# Allegro board B-G431B-ESC1_V10_220728.brd
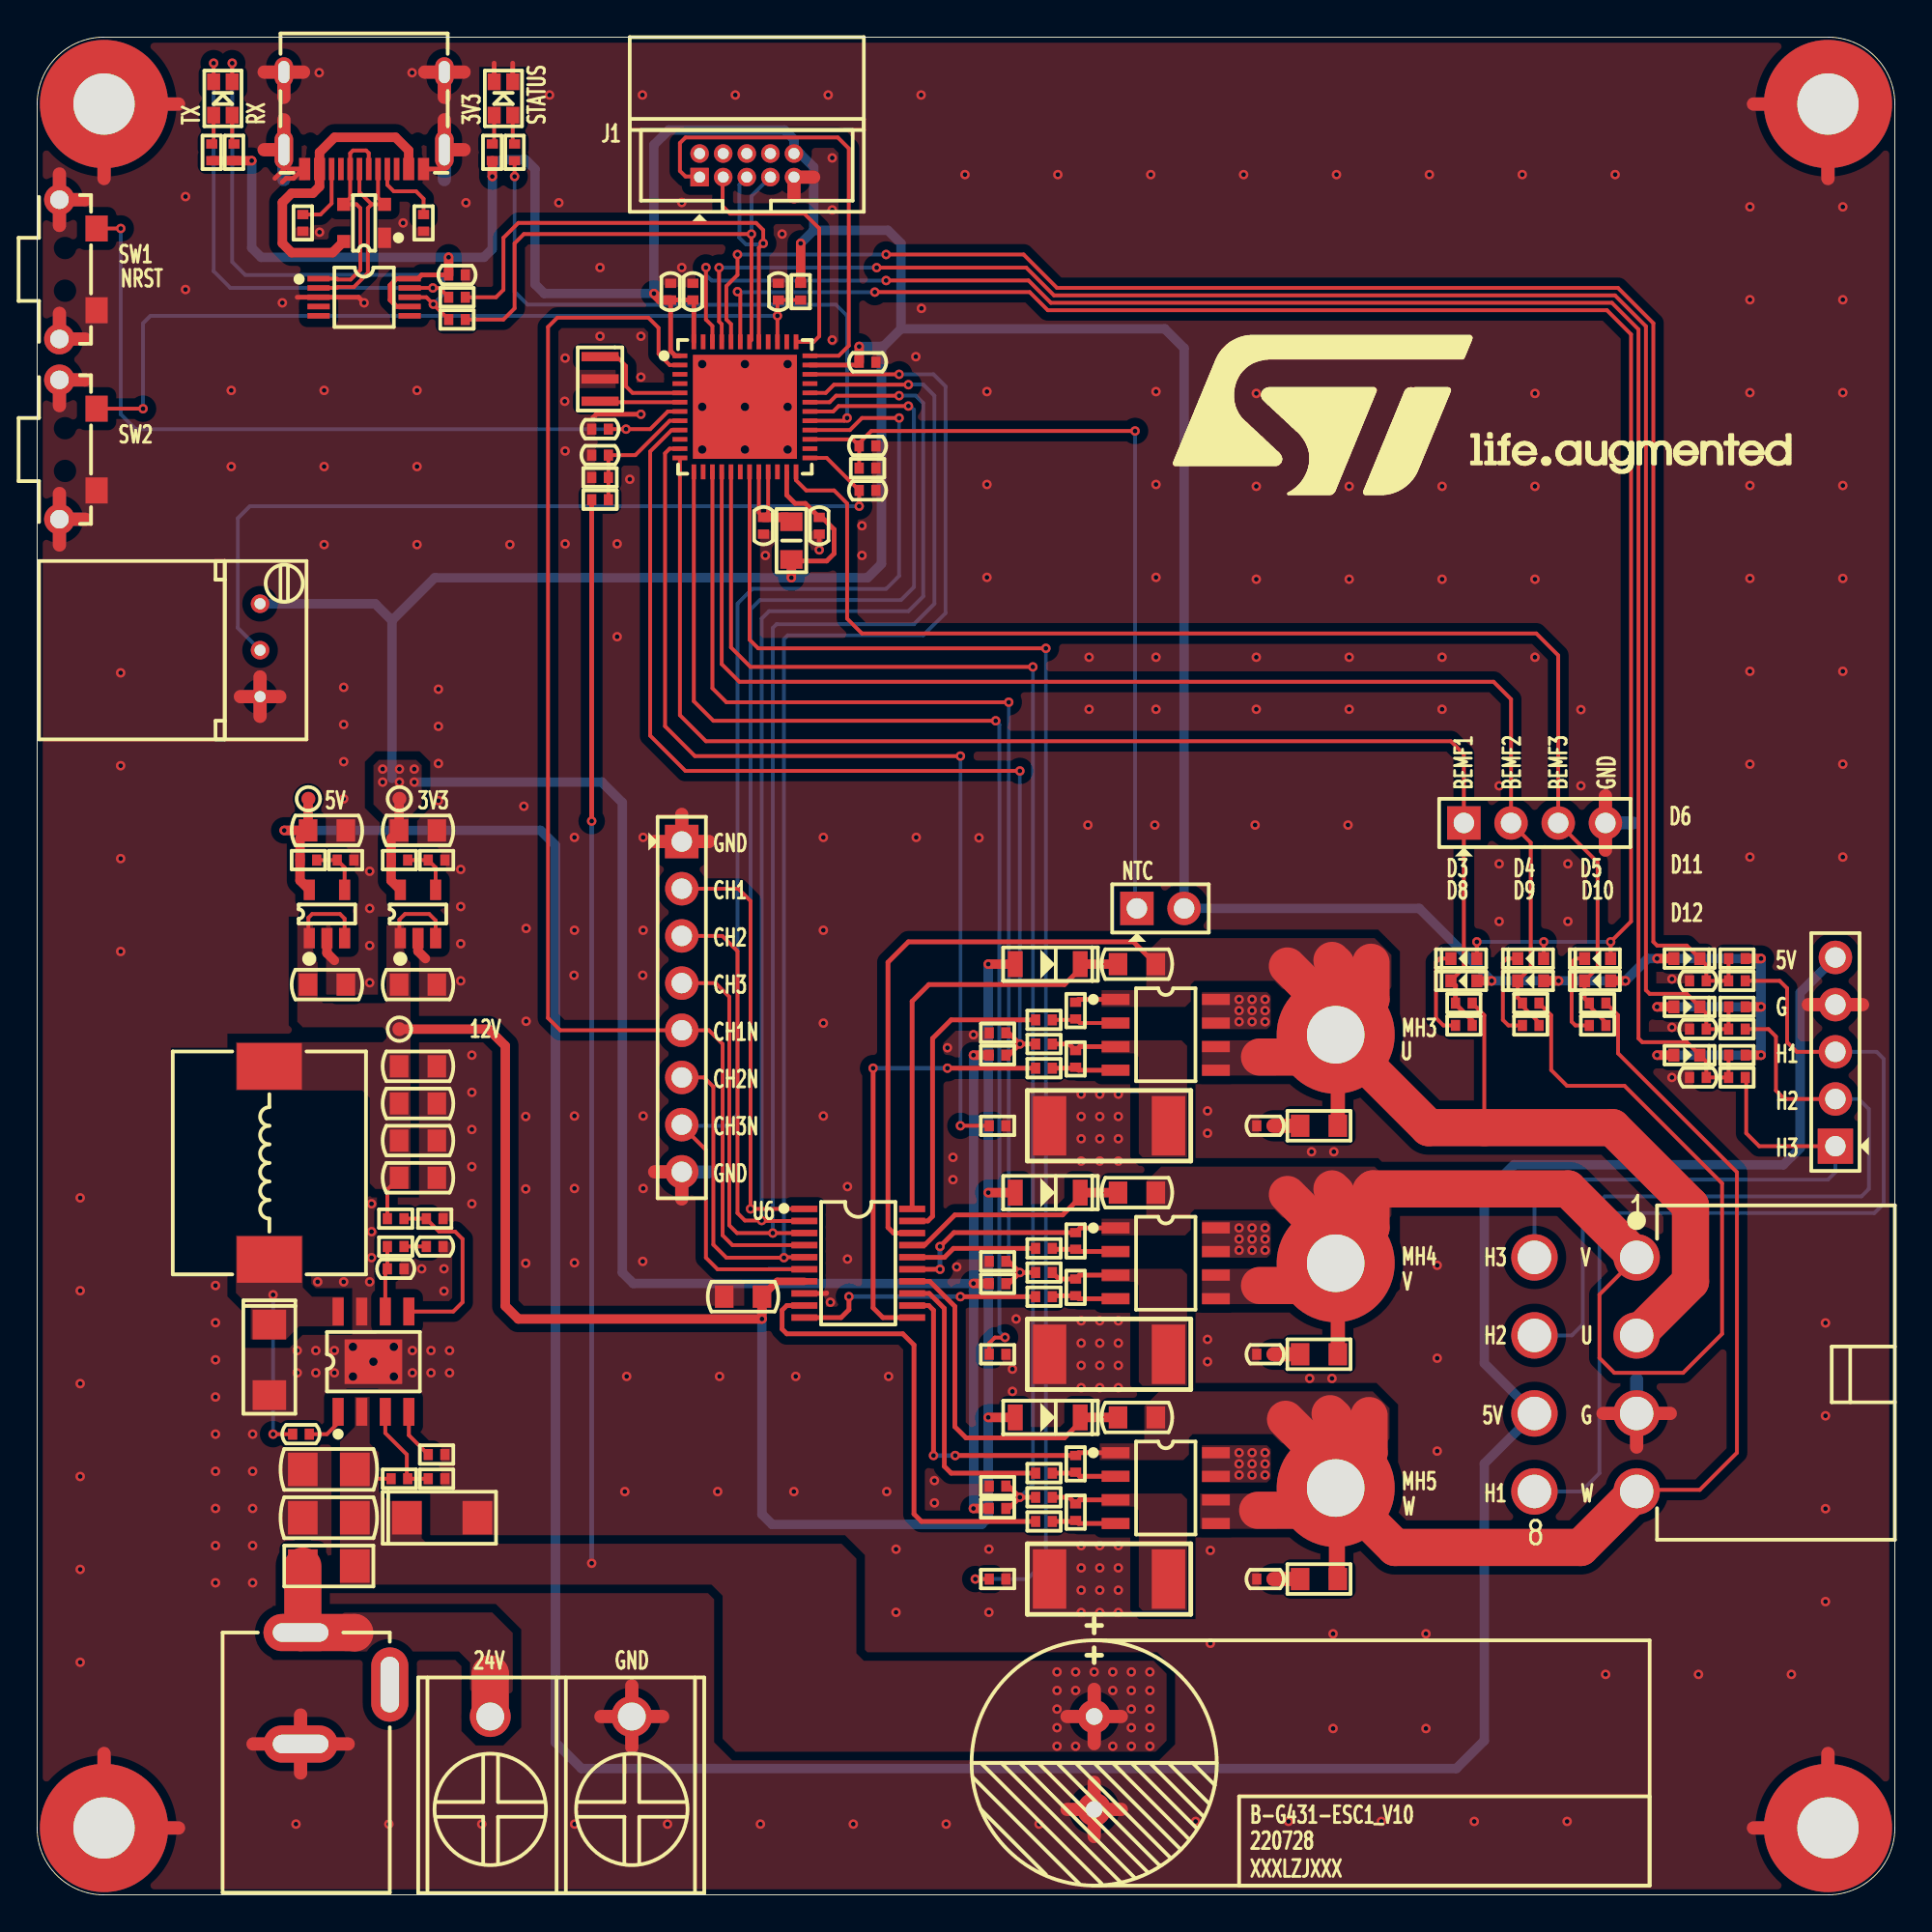
[diagram p0: board, top side]
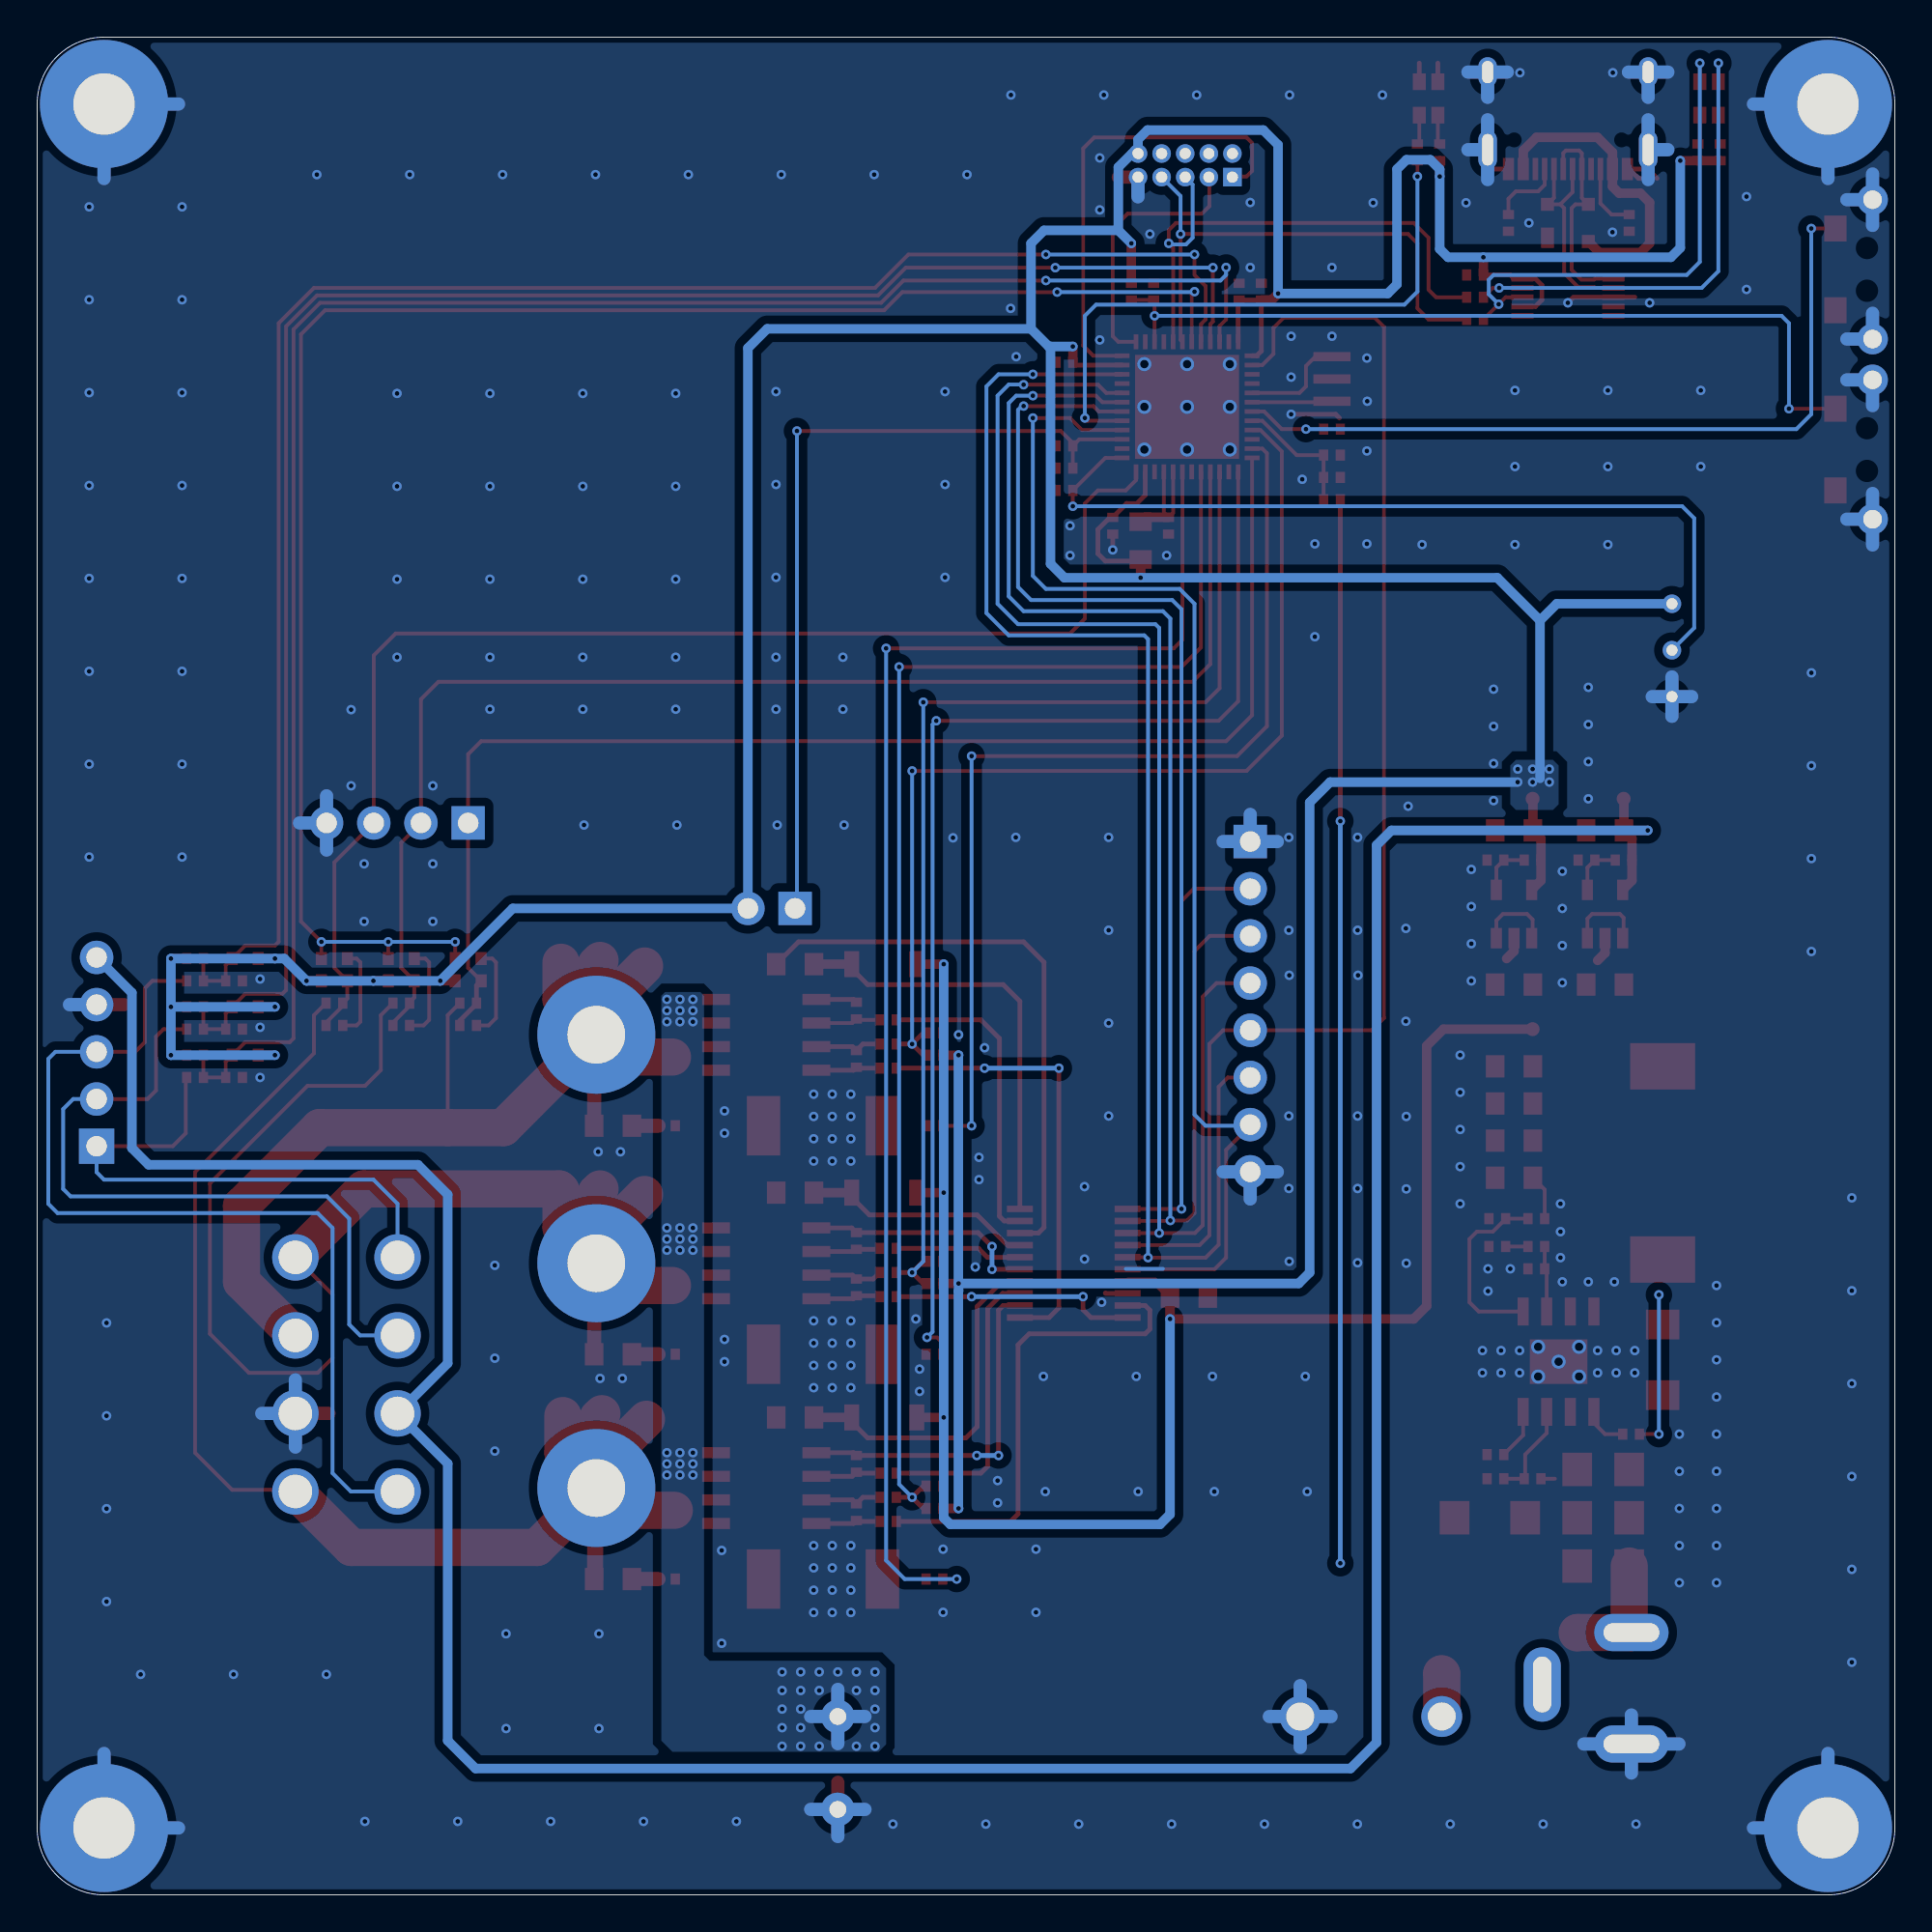
[diagram p1: board, bottom side, seen from below]

Outline 100 x 100 mm; copper layers: TOP, BOTTOM. Coordinates in mm from the lower left corner of the outline.
Outline path: 0,96.4 arc(1.05,98.95) 3.6,100 96.4,100 arc(98.95,98.95) 100,96.4 100,3.6 arc(98.95,1.05) 96.4,0 3.6,0 arc(1.05,1.05) 0,3.6 0,96.4

## Design rules (mm)
constraint set DEFAULT: min track width 0.203, pair gap 0.203
net group USB_D: nets USB_DM USB_DP

## Placement (name value [footprint] x y rotation side)
C1  100nF_50V  [C0402]  22.6 87.2 180 top
C2  100nF_50V  [C0402]  34.1 86.3 90 top
C3  100nF_50V  [C0402]  35.3 86.3 90 top
C4  100nF_50V  [C0402]  39.9 86.3 90 top
C5  100nF_50V  [C0402]  44.7 82.5 0 top
C6  100nF_50V  [C0402]  30.3 78.9 180 top
C7  100nF_50V  [C0402]  44.7 78 0 top
C8  100nF_50V  [C0402]  30.3 77.5 180 top
C9  100nF_50V  [C0402]  44.7 75.6 0 top
C10  100nF_50V  [C0402]  39.1 73.7 270 top
C11  100nF_50V  [C0402]  42.1 73.7 270 top
C12  10uF_25V  [C0805]  15.6 57.3 0 top
C13  10uF_25V  [C0805]  20.5 57.3 0 top
C14  1uF_50V  [C0805]  59.2 50.1 0 top
C15  100nF_50V  [C0402]  89.4 49.2 180 top
C16  10uF_25V  [C0805]  15.6 49 0 top
C17  10uF_25V  [C0805]  20.5 49 0 top
C18  100nF_50V  [C0402]  89.4 46.6 180 top
C19  10uF_25V  [C0805]  20.5 44.6 0 top
C20  100nF_50V  [C0402]  89.4 44 180 top
C21  10uF_25V  [C0805]  20.5 42.6 0 top
C22  10nF_50V  [C0402]  66.1 41.4 180 top
C23  10uF_25V  [C0805]  20.5 40.6 0 top
C24  10uF_25V  [C0805]  20.5 38.6 0 top
C25  1uF_50V  [C0805]  59.2 37.8 0 top
C26  10nF_50V  [C0402]  21.4 34.9 0 top
C27  47pF_50V  [C0402]  19.3 33.7 0 top
C28  10uF_25V  [C0805]  38 32.2 180 top
C29  10nF_50V  [C0402]  66.1 29.1 180 top
C30  1uF_50V  [C0805]  59.2 25.7 0 top
C31  100nF_50V  [C0402]  14.2 24.8 180 top
C32  10uF_50V  [C1206]  15.7 22.9 180 top
C33  10uF_50V  [C1206]  15.7 20.3 180 top
C34  10nF_50V  [C0402]  66.1 17 180 top
C35  1000uF_50V  [CAP-5R0-13X27]  56.9 7.1 270 top
D1  -  [XL-2012SURUGC]  10 96.7 270 top
D2  -  [XL-2012SURUGC]  25.1 96.7 270 top
D3  LRB521S-40T1G  [SOD523]  76.8 50.4 0 top
D4  LRB521S-40T1G  [SOD523]  80.4 50.4 0 top
D5  LRB521S-40T1G  [SOD523]  84 50.4 0 top
D6  LRB521S-40T1G  [SOD523]  88.8 50.4 180 top
D7  1N4148  [SOD123]  54.4 50.1 180 top
D8  LRB521S-40T1G  [SOD523]  76.8 49.2 0 top
D9  LRB521S-40T1G  [SOD523]  80.4 49.2 0 top
D10  LRB521S-40T1G  [SOD523]  84 49.2 0 top
D11  LRB521S-40T1G  [SOD523]  88.8 47.8 180 top
D12  LRB521S-40T1G  [SOD523]  88.8 45.2 180 top
D13  1N4148  [SOD123]  54.4 37.8 180 top
D14  SS56F  [SMAF]  12.5 28.8 90 top
D15  1N4148  [SOD123]  54.4 25.7 180 top
D16  SS56F  [SMAF]  21.8 20.3 180 top
DC1  -  [DC005]  14.18 8.12 90 top
F1  0469005.WR  [FUSE1206]  15.7 17.7 0 top
J1  -  [DC3-10P-Z]  38.2 93.1 180 top
J2  -  [CN1X5-2P54-Z]  96.8 40.3 90 top
J3  -  [HX42003-8WAF]  86.1 28.01 0 top
J4  KF7.62-2P  [KF7R62-2P]  28.2 9.6 180 top
J5  -  [CN1X8-2P54-Z]  34.7 56.7 270 top
J6  -  [CN1X4-2P54-Z]  76.8 57.7 0 top
L1  BLM21PG600SN1D  [L0805]  40.6 72.9 90 top
L2  SMMS1040-6R8  [L10040]  12.5 39.4 90 top
MH1  HOLE_M3/NI  [HOLE6R90X3R40]  3.6 96.4 0 top
MH2  HOLE_M3/NI  [HOLE6R90X3R40]  96.4 96.4 0 top
MH3  HOLE_M3/NI  [HOLE6R35X3R10]  69.9 46.3 0 top
MH4  HOLE_M3/NI  [HOLE6R35X3R10]  69.9 34 0 top
MH5  HOLE_M3/NI  [HOLE6R35X3R10]  69.9 21.9 0 top
MH6  HOLE_M3/NI  [HOLE6R90X3R40]  3.6 3.6 0 top
MH7  HOLE_M3/NI  [HOLE6R90X3R40]  96.4 3.6 0 top
NOREF  -  []  0 0 0 top
NOREF#2  -  []  0 0 90 top
Q1  NCE6005AS  [SOIC8]  60.75 46.3 270 top
Q2  NCE6005AS  [SOIC8]  60.75 34 270 top
Q3  NCE6005AS  [SOIC8]  60.75 21.9 270 top
R1  4.7K  [R0402]  9.4 93.8 270 top
R2  4.7K  [R0402]  10.6 93.8 270 top
R3  1K  [R0402]  24.5 93.8 90 top
R4  1K  [R0402]  25.7 93.8 90 top
R5  4.7K  [R0402]  14.3 90 270 top
R6  4.7K  [R0402]  20.8 90 90 top
R7  10K  [R0402]  41.1 86.3 270 top
R8  1K  [R0402]  22.6 86 180 top
R9  1K  [R0402]  22.6 84.8 180 top
R10  47K  [R0402]  44.7 76.8 180 top
R11  22K  [R0402]  30.3 76.3 0 top
R12  200K  [R0402]  30.3 75.1 180 top
R13  63.4K  [R0402]  14.6 55.7 0 top
R14  20K  [R0402]  16.6 55.7 0 top
R15  33K  [R0402]  19.5 55.7 0 top
R16  20K  [R0402]  21.5 55.7 0 top
R17  MF52A103F3950(A1)  [CN1X2-2P54-Z]  59.2 53.1 0 top
R18  10K  [R0402]  91.5 50.4 0 top
R19  1.5K  [R0402]  91.5 49.2 180 top
R20  10K  [R0402]  76.8 48 180 top
R21  10K  [R0402]  80.4 48 180 top
R22  10K  [R0402]  84 48 180 top
R23  10K  [R0402]  91.5 47.8 0 top
R24  10K  [R0402]  55.9 47.6 90 top
R25  33R  [R0402]  54.2 47.1 0 top
R26  2.2K  [R0402]  76.8 46.8 180 top
R27  2.2K  [R0402]  80.4 46.8 180 top
R28  2.2K  [R0402]  84 46.8 180 top
R29  1.5K  [R0402]  91.5 46.6 180 top
R30  2.2K  [R0402]  51.7 46.4 0 top
R31  1.5K  [R0402]  54.2 45.8 0 top
R32  22K  [R0402]  51.7 45.2 180 top
R33  10K  [R0402]  91.5 45.2 0 top
R34  10K  [R0402]  55.9 45 270 top
R35  33R  [R0402]  54.2 44.5 0 top
R36  1.5K  [R0402]  91.5 44 180 top
R37  0R/NI  [R0402]  51.7 41.4 0 top
R38  0R003  [R2512]  57.7 41.4 0 top
R39  1R  [R0805]  69 41.4 0 top
R40  200K  [R0402]  19.3 36.4 0 top
R41  14.3K  [R0402]  21.4 36.4 0 top
R42  10K  [R0402]  55.9 35.2 90 top
R43  10K  [R0402]  19.3 34.9 180 top
R44  33R  [R0402]  54.2 34.8 0 top
R45  2.2K  [R0402]  51.7 34.1 0 top
R46  1.5K  [R0402]  54.2 33.5 0 top
R47  22K  [R0402]  51.7 32.9 180 top
R48  10K  [R0402]  55.9 32.7 270 top
R49  33R  [R0402]  54.2 32.2 0 top
R50  0R/NI  [R0402]  51.7 29.1 0 top
R51  0R003  [R2512]  57.7 29.1 0 top
R52  1R  [R0805]  69 29.1 0 top
R53  200K  [R0402]  21.5 23.7 180 top
R54  10K  [R0402]  55.9 23.2 90 top
R55  33R  [R0402]  54.2 22.7 0 top
R56  330K  [R0402]  19.5 22.4 180 top
R57  75K  [R0402]  21.5 22.4 180 top
R58  2.2K  [R0402]  51.7 22 0 top
R59  1.5K  [R0402]  54.2 21.4 0 top
R60  22K  [R0402]  51.7 20.8 180 top
R61  10K  [R0402]  55.9 20.6 270 top
R62  33R  [R0402]  54.2 20.1 0 top
R63  0R/NI  [R0402]  51.7 17 0 top
R64  0R003  [R2512]  57.7 17 0 top
R65  1R  [R0805]  69 17 0 top
RP1  3296W-1-503  [3296W]  12 67 90 top
SW1  -  [K2-1112SW-A4SW-04]  1.5 87.5 90 top
SW2  -  [K2-1112SW-A4SW-04]  1.5 77.8 90 top
TP1  TP/NI  [TP-0R75]  14.6 59 270 top
TP2  TP/NI  [TP-0R75]  19.5 59 270 top
TP3  TP/NI  [TP-0R75]  19.5 46.6 270 top
U1  PRTR5V0U2X  [SOT143B]  17.6 90 90 top
U2  CH340E  [MSOP10]  17.6 86 270 top
U3  STM32G431CBU6  [QFN48-7X7X0R5-5R6X5R6]  38.1 80.1 270 top
U4  SPX3819M5-L-ADJ  [SOT23-5]  15.6 52.8 0 top
U5  SPX3819M5-L-ADJ  [SOT23-5]  20.5 52.8 0 top
U6  EG2124A  [TSSOP20]  44.2 34 270 top
U7  TPS54340DDAR  [SOIC8-3R10X2R40]  18.1 28.7 0 top
USB1  -  [TYPE-C-31-M-12]  17.6 92.9 180 top
X1  CSTCE8M00G15C99-R0  [X-3P-3R2X1R3-SMD]  30.3 81.6 270 top

## Library data of the parts
C1-C3 C5 C7 C9-C11 C22 C29 C34 = CAP NP_2
C4 C6 C8 C14 C15 C18 C20 C25 C28 C30 = CAP NP
C12 C13 C16 C17 C19 C21 C23 C24 C26 C27 C31-C33 = CAP NP_3
C35 = CAPT_100UF_3528_6r3V_10%_LXXXX
D1 D2 = XL-2012SURUGC
D3-D16 = DIODE13_9
DC1 = DC005
F1 = FUSE
J1 = DC3-10P-Z-L
J2 = CONN RCPT 5
J3 = HX30002-10A_2
J4 R17 = CONN RCPT 2
J5 = CONN RCPT 8
J6 = CONN RCPT 4
L1 = IND_BEAD_0805_600OHM_1
L2 = INDUCTOR_0
MH1-MH7 = Hold_1
Q1-Q3 = IRF7351TRPBF
R1-R16 R18-R65 = R_Generic
RP1 = 3296W-1-503
SW1 SW2 = SWITCH-SPST-4P
TP1-TP3 = TestPoint
U1 = PRTR5V0U2X
U2 = CH340E
U3 = STM32G431CBU6
U4 U5 = SPX3819M5-L-1-2
U6 = EG2124A
U7 = TPS54340DDAR
USB1 = TYPE-C_0
X1 = XTAL_5032_0

## Footprints (pads in the part's own frame, mm; a bottom-side part is the same pattern mirrored in y, then rotated)
3296W
  round 1 hole 0.6: 1(-2.5,0) 2(0,0) 3(2.5,0)
C0402
  rect 0.5x0.6 smd: 1(-0.45,0) 2(0.45,0)
C0805
  rect 1x1.2 smd: 1(-1.016,0) 2(1.016,0)
C1206
  rect 1.6x1.8 smd: 1(-1.4,0) 2(1.4,0)
CAP-5R0-13X27
  round 1.8 hole 0.9: 1(-2.5,0) 2(2.5,0)
CN1X2-2P54-Z
  rect 1.8x1.8 hole 1.1: 1(0,0)
  round 1.8 hole 1.1: 2(2.54,0)
CN1X4-2P54-Z
  rect 1.8x1.8 hole 1.1: 1(0,0)
  round 1.8 hole 1.1: 2(2.54,0) 3(5.08,0) 4(7.62,0)
CN1X5-2P54-Z
  rect 1.9x1.9 hole 1.1: 1(0,0)
  round 1.8 hole 1.1: 2(2.54,0) 3(5.08,0) 4(7.62,0) 5(10.16,0)
CN1X8-2P54-Z
  rect 1.8x1.8 hole 1.1: 1(0,0)
  round 1.8 hole 1.1: 2(2.54,0) 3(5.08,0) 4(7.62,0) 5(10.16,0) 6(12.7,0) 7(15.24,0) 8(17.78,0)
DC3-10P-Z
  rect 1x1 hole 0.6: 1(2.54,0.635)
  round 1 hole 0.6: 2(2.54,-0.635) 3(1.27,0.635) 4(1.27,-0.635) 5(0,0.635) 6(0,-0.635) 7(-1.27,0.635) 8(-1.27,-0.635) 9(-2.54,0.635) 10(-2.54,-0.635)
DC005
  oval 2x4 hole 1x3: 1(6,0) 2(0,0)
  oval 4x2 hole 3x1: 3(3.2,-4.8)
FUSE1206
  rect 1.6x1.8 smd: 1(-1.4,0) 2(1.4,0)
HOLE6R35X3R10
  round 6.35 hole 3.1: 1(0,0)
HOLE6R90X3R40
  round 6.9 hole 3.3: 1(0,0)
HX42003-8WAF
  round 2.5 hole 1.8: 1(0,6.3) 2(0,2.1) 3(0,-2.1) 4(0,-6.3) 5(-5.5,6.3) 6(-5.5,2.1) 7(-5.5,-2.1) 8(-5.5,-6.3)
K2-1112SW-A4SW-04
  round 1.65 hole 1: 1(-3.75,0.3) 4(3.75,0.3)
  rect 1.4x1.2 smd: 2(-2.2,-1.7) 3(2.2,-1.7)
KF7R62-2P
  round 2.2 hole 1.5: 1(-3.81,0) 2(3.81,0)
L0805
  rect 1x1.2 smd: 1(-1.016,0) 2(1.016,0)
L10040
  rect 2.5x3.5 smd: 1(-5.2,0) 2(5.2,0)
MSOP10
  rect 0.3x1.2 smd: 1(-1,-2.45) 2(-0.5,-2.45) 3(0,-2.45) 4(0.5,-2.45) 5(1,-2.45) 6(1,2.45) 7(0.5,2.45) 8(0,2.45) 9(-0.5,2.45) 10(-1,2.45)
QFN48-7X7X0R5-5R6X5R6
  rect 0.25x0.8 smd: 1(-2.75,-3.5) 2(-2.25,-3.5) 3(-1.75,-3.5) 4(-1.25,-3.5) 5(-0.75,-3.5) 6(-0.25,-3.5) 7(0.25,-3.5) 8(0.75,-3.5) 9(1.25,-3.5) 10(1.75,-3.5) 11(2.25,-3.5) 12(2.75,-3.5) 25(2.75,3.5) 26(2.25,3.5) 27(1.75,3.5) 28(1.25,3.5) 29(0.75,3.5) 30(0.25,3.5) 31(-0.25,3.5) 32(-0.75,3.5) 33(-1.25,3.5) 34(-1.75,3.5) 35(-2.25,3.5) 36(-2.75,3.5)
  rect 0.8x0.25 smd: 13(3.5,-2.75) 14(3.5,-2.25) 15(3.5,-1.75) 16(3.5,-1.25) 17(3.5,-0.75) 18(3.5,-0.25) 19(3.5,0.25) 20(3.5,0.75) 21(3.5,1.25) 22(3.5,1.75) 23(3.5,2.25) 24(3.5,2.75) 37(-3.5,2.75) 38(-3.5,2.25) 39(-3.5,1.75) 40(-3.5,1.25) 41(-3.5,0.75) 42(-3.5,0.25) 43(-3.5,-0.25) 44(-3.5,-0.75) 45(-3.5,-1.25) 46(-3.5,-1.75) 47(-3.5,-2.25) 48(-3.5,-2.75)
  rect 5.6x5.6 smd: 49(0,0)
R0402
  rect 0.5x0.6 smd: 1(-0.45,0) 2(0.45,0)
R0805
  rect 1x1.2 smd: 1(-1.016,0) 2(1.016,0)
R2512
  rect 1.8x3.2 smd: 1(-3.2,0) 2(3.2,0)
SMAF
  rect 1.6x1.8 smd: 1(-1.9,0) 2(1.9,0)
SOD123
  rect 0.8x1.4 smd: 1(1.75,0) 2(-1.75,0)
SOD523
  rect 0.6x0.7 smd: 1(-0.7,0) 2(0.7,0)
SOIC8
  rect 0.6x1.5 smd: 1(-1.9,-2.7) 2(-0.63,-2.7) 3(0.64,-2.7) 4(1.91,-2.7) 5(1.91,2.7) 6(0.64,2.7) 7(-0.63,2.7) 8(-1.9,2.7)
SOIC8-3R10X2R40
  rect 0.6x1.5 smd: 1(-1.9,-2.7) 2(-0.63,-2.7) 3(0.64,-2.7) 4(1.91,-2.7) 5(1.91,2.7) 6(0.64,2.7) 7(-0.63,2.7) 8(-1.9,2.7)
  rect 3.1x2.4 smd: 9(0,0)
SOT23-5
  rect 0.6x1.1 smd: 1(-0.95,-1.3) 2(0,-1.3) 3(0.95,-1.3) 4(0.95,1.3) 5(-0.95,1.3)
SOT143B
  rect 1.1x0.7 smd: 1(-0.8,-1.1)
  rect 0.7x0.7 smd: 2(1,-1.1) 3(1,1.1) 4(-1,1.1)
TP-0R75
  round 0.75 smd: 1(0,0)
TSSOP20
  rect 0.35x1.4 smd: 1(-2.925,-2.9) 2(-2.275,-2.9) 3(-1.625,-2.9) 4(-0.975,-2.9) 5(-0.325,-2.9) 6(0.325,-2.9) 7(0.975,-2.9) 8(1.625,-2.9) 9(2.275,-2.9) 10(2.925,-2.9) 11(2.925,2.9) 12(2.275,2.9) 13(1.625,2.9) 14(0.975,2.9) 15(0.325,2.9) 16(-0.325,2.9) 17(-0.975,2.9) 18(-1.625,2.9) 19(-2.275,2.9) 20(-2.925,2.9)
TYPE-C-31-M-12
  rect 0.6x1.2 smd: 1(-3.2,0) 2(-2.4,0) 11(2.4,0) 12(3.2,0)
  rect 0.3x1.2 smd: 3(-1.75,0) 4(-1.25,0) 5(-0.75,0) 6(-0.25,0) 7(0.25,0) 8(0.75,0) 9(1.25,0) 10(1.75,0)
  oval 1x2.1 hole 0.6x1.7: 13(-4.32,-1.04) 14(4.32,-1.04)
  oval 1x1.6 hole 0.6x1.2: 15(-4.32,-5.22) 16(4.32,-5.22)
X-3P-3R2X1R3-SMD
  rect 0.5x2 smd: 1(-1.2,0) 2(0,0) 3(1.2,0)
XL-2012SURUGC
  rect 0.9x0.7 smd: 1(-0.9,0.5) 2(0.9,0.5) 3(-0.9,-0.5) 4(0.9,-0.5)

## Nets
GND: C1.1 C2.2 C3.2 C4.2 C5.2 C6.2 C7.2 C8.2 C9.2 C10.2 C11.2 C12.2 C13.2 C15.2 C16.2 C17.2 C18.2 C19.2 C20.2 C21.2 C22.2 C23.2 C24.2 C26.2 C27.2 C28.2 C29.2 C32.2 C33.2 C34.2 C35.2 D2.1(R-) D2.3 D14.1 D16.1 DC1.2 J1.9 J2.4 J3.3 J4.1 J5.1 J5.8 J6.4 MH1.1 MH2.1 MH6.1 MH7.1 R5.2 R6.1 R10.1 R11.1 R14.2 R16.2 R30.1 R37.2 R38.1 R41.2 R45.1 R50.2 R51.1 R53.1 R57.1 R58.1 R63.2 R64.1 RP1.1 SW1.1 SW1.2 SW1.4 SW2.1 SW2.2 SW2.4 U1.1 U2.3 U3.49 U4.2 U5.2 U6.8 U7.7 U7.9 USB1.1 USB1.12 USB1.13 USB1.14 USB1.15 USB1.16 X1.2
VBUS: C8.1 R11.2 R12.1 U3.8
VCC_3.3V: C1.2 C2.1 C3.1 C5.1 C11.1 C13.1 D6.2(ANODE_2) D8.2(ANODE_2) D9.2(ANODE_2) D10.2(ANODE_2) D11.2(ANODE_2) D12.2(ANODE_2) J1.10 L1.1 R1.2 R2.2 R3.1 R7.1 R15.1 R17.2 R18.2 R23.2 R32.2 R33.2 R47.2 R60.2 RP1.3 TP2.1 U2.7(VCC) U2.10 U3.1 U3.23 U3.35 U3.48 U5.5(VOUT)
VCC_5V: C12.1 J2.5 J3.7 R13.1 TP1.1 U4.5(VOUT)
VCC_5V_USB: U1.4 USB1.2 USB1.11(VBUS2)
VCC_12V: C16.1 C17.1 C19.1 C21.1 C23.1 C24.1 C28.1 D7.1 D13.1 D15.1 L2.2 R40.1 TP3.1 U4.1 U4.3 U5.1 U5.3 U6.7
VCC_24V: C32.1 C33.1 C35.1 D16.2(ANODE_2) F1.2 Q1.7 Q1.8 Q2.7 Q2.8 Q3.7 Q3.8 R12.2 R56.2 U7.2(VIN)
VCC_24V_IN: DC1.1 F1.1 J4.2
VDDA: C10.1 L1.2(B) U3.20(VREF+) U3.21
A+/H1: C15.1 D6.1 R18.1 R19.2 U3.44
B+/H2: C18.1 D11.1 R23.1 R29.2 U3.45
BEMF1: D8.1 J6.1 R20.2 R26.1 U3.12
BEMF2: D9.1 J6.2 R21.2 R27.1 U3.16
BEMF3: D10.1 J6.3 R22.2 R28.1 U3.24
BUTTON: C4.1 R7.2 SW2.3 U3.39
CH340E_RXD: D1.3 R8.2 U2.9
CH340E_TXD: D1.1(R-) R9.2 U2.8
CURR_FDBK1_OPAMP+: R30.2 R31.1 R32.1 U3.9
CURR_FDBK1_OPAMP-: R37.1 U3.11
CURR_FDBK2_OPAMP+: R45.2 R46.1 R47.1 U3.15
CURR_FDBK2_OPAMP-: R50.1 U3.13
CURR_FDBK3_OPAMP+: R58.2 R59.1 R60.1 U3.17
CURR_FDBK3_OPAMP-: R63.1 U3.19
GPIO_BEMF: D3.2(ANODE_2) D4.2(ANODE_2) D5.2(ANODE_2) U3.43
H1: J2.3 J3.8 R19.1
H2: J2.2 J3.6 R29.1
H3: J2.1 J3.5 R36.1
HO1: R25.1 U6.19
HO2: R44.1 U6.16
HO3: R55.1 U6.13
LO1: R35.1 U6.11
LO2: R49.1 U6.10
LO3: R62.1 U6.9
MOTOR_U: C14.2 J3.2 MH3.1 Q1.1 Q1.5 Q1.6 R20.1 R24.2 R39.2 U6.18
MOTOR_V: C25.2 J3.1 MH4.1 Q2.1 Q2.5 Q2.6 R21.1 R42.2 R52.2 U6.15
MOTOR_W: C30.2 J3.4 MH5.1 Q3.1 Q3.5 Q3.6 R22.1 R54.2 R65.2 U6.12(VS3)
NRST: C6.1 SW1.3 U3.7
OSC_IN: U3.5 X1.1
OSC_OUT: U3.6 X1.3
POTENTIOMETER: C9.1 RP1.2 U3.25
STATUS: R4.1 U3.29
SWCLK: J1.3 U3.37
SWDIO: J1.1 U3.36
TEMPERATURE_FEEDBACK: C7.1 R10.2 R17.1 U3.27
TIM1_CH1: J5.2 U3.30 U6.1
TIM1_CH1N: J5.5 U3.2 U6.4
TIM1_CH2: J5.3 U3.31 U6.2
TIM1_CH2N: J5.6 U3.34 U6.5
TIM1_CH3: J5.4 U3.32 U6.3
TIM1_CH3N: J5.7 U3.28 U6.6
USART2_RX: J1.7 R9.1 U3.42
USART2_TX: J1.5 R8.1 U3.41
USB_DM: U1.2 U2.2 USB1.5 USB1.7
USB_DP: U1.3 U2.1 USB1.6 USB1.8
VB1: C14.1 D7.2(ANODE_2) U6.20
VB2: C25.1 D13.2(ANODE_2) U6.17
VB3: C30.1 D15.2(ANODE_2) U6.14
VSHUNT1+: Q1.3(S2) R31.2 R34.1 R38.2
VSHUNT2+: Q2.3(S2) R46.2 R48.1 R51.2
VSHUNT3+: Q3.3(S2) R59.2 R61.1 R64.2
Z+/H3: C20.1 D12.1 R33.1 R36.2 U3.46
N17247390: D2.4 R3.2
N17247402: D2.2 R4.2
N17273688: Q1.2 R24.1 R25.2
N17273734: Q1.4 R34.2 R35.2
N17273904: Q2.2 R42.1 R44.2
N17273950: Q2.4 R48.2 R49.2
N17274120: Q3.2 R54.1 R55.2
N17274166: Q3.4 R61.2 R62.2
N17276179: C22.1 R39.1
N17276228: C29.1 R52.1
N17276293: C34.1 R65.1
N17277391: C31.1 U7.1
N17277395: C31.2 D14.2(ANODE_2) L2.1 U7.8
N17277528: R40.2 R41.1 U7.5
N17277556: R56.1 R57.2 U7.3
N17277560: C27.1 R43.2 U7.6
N17277584: R53.2 U7.4
N17277642: C26.1 R43.1
N17277768: R15.2 R16.1 U5.4
N17277886: R13.2 R14.1 U4.4
N17278520: D3.1 R26.2
N17278525: D4.1 R27.2
N17278530: D5.1 R28.2
N17295441: D1.2 R2.1
N17295448: R6.2 USB1.4
N17295460: D1.4 R1.1
N17295531: R5.1 USB1.10

Pads without a net: DC1 3; J1 2 4 6 8; U2 4 5 6; U3 3 4 10 14 18 22 26 33 38 40 47; USB1 3 9

## Via types
v1: diameter 0.508, hole 0.254, TOP to BOTTOM, 441 vias
v2: diameter 0.762, hole 0.457, TOP to BOTTOM, 14 vias

## Routing (per net, layer and track width the routed paths; a pad name or vN(x,y) marks a point on that pad's centre or on a via; arc(x,y) is an arc through that point)
GND: length 231.3
  TOP w0.254: C11.2 v1(42.1,72.4) ; 14,86 U2.3 17.3,86 v1(17.6,85.7) ; 29.9,79.5 30.1,79.7 v1(32.5,79.7) ; 13.28,93.15 13.53,92.9 14.3,92.9 ; 13.28,93.15 USB1.14 ; 13.28,93.15 13.28,92.88 12.8,92.4 ; 21.92,93.15 21.67,92.9 USB1.1 ; 14.3,92.9 USB1.12 ; 14.3,92.9 13.8,92.4 13.4,92.4 13.2,92.2 ; 42.5,32.4 42.48,32.38 U6.8 ; D2.1 25.6,98.6 ; D2.3 24.6,98.6
  TOP w0.508: U5.2 20.5,50.8 20.9,50.4 ; U4.2 15.6,50.7 16,50.3
  TOP w0.711: 14.18,6.56 DC1.2 ; DC1.2 16.74,8.12 ; DC1.2 14.18,9.68 ; DC1.2 11.62,8.12 ; USB1.16 14.34,98.12 ; USB1.16 12.22,98.12 ; USB1.16 13.28,96.76 ; 32.01,7.94 J4.1 ; J4.1 32.01,11.26 ; J4.1 33.67,9.6 ; J4.1 30.35,9.6 ; USB1.13 21.92,93.15 ; USB1.13 22.98,93.94 ; USB1.13 21.92,95.55 ; 10.94,64.5 RP1.1 ; RP1.1 12,63.44 ; RP1.1 12,65.56 ; RP1.1 13.06,64.5 ; SW1.4 2.58,91.25 ; SW1.4 1.2,89.87 ; SW1.4 1.2,92.63 ; 21.92,96.76 USB1.15 ; USB1.15 22.98,98.12 ; USB1.15 20.86,98.12 ; 55.44,4.6 C35.2 ; C35.2 56.9,3.14 ; C35.2 56.9,6.06 ; C35.2 58.36,4.6 ; 84.42,56.24 J6.4 84.42,59.16 ; 40.74,91.41 J1.9 41.8,92.47 ; 84.29,25.91 J3.3 ; J3.3 86.1,24.11 ; J3.3 87.91,25.91 ; 34.7,37.46 J5.8 33.24,38.92 ; 3.6,7.61 MH6.1 7.61,3.6 ; 96.4,92.39 MH2.1 92.39,96.4 ; 13.28,95.55 USB1.14 12.22,93.94 ; SW2.1 1.2,75.43 ; SW2.1 1.2,72.67 ; SW2.1 2.58,74.05 ; 1.2,80.17 SW2.4 2.58,81.55 ; 3.6,92.39 MH1.1 7.61,96.4 ; 33.24,56.7 J5.1 ; J5.1 36.16,56.7 ; J5.1 34.7,58.16 ; 98.26,47.92 J2.4 95.34,47.92 ; 92.39,3.6 MH7.1 96.4,7.61 ; 2.58,83.75 SW1.1 1.2,85.13
  BOTTOM w0.203: 41.4,33.7 39.4,33.7
  BOTTOM w0.711: 12.22,93.94 USB1.14 ; USB1.14 13.28,92.33 ; USB1.14 13.28,95.55 ; 34.7,37.46 J5.8 ; J5.8 33.24,38.92 ; J5.8 36.16,38.92 ; 10.94,64.5 RP1.1 ; RP1.1 12,63.44 ; RP1.1 12,65.56 ; RP1.1 13.06,64.5 ; J3.3 87.91,25.91 ; J3.3 86.1,24.11 ; J3.3 86.1,27.72 ; 7.61,3.6 MH6.1 3.6,7.61 ; 92.39,96.4 MH2.1 96.4,92.39 ; DC1.2 14.18,9.68 ; DC1.2 16.74,8.12 ; DC1.2 14.18,6.56 ; DC1.2 11.62,8.12 ; 2.58,81.55 SW2.4 1.2,80.17 ; USB1.15 22.98,98.12 ; USB1.15 20.86,98.12 ; USB1.15 21.92,96.76 ; 92.39,3.6 MH7.1 96.4,7.61 ; J2.4 98.26,47.92 ; USB1.16 14.34,98.12 ; USB1.16 12.22,98.12 ; USB1.16 13.28,96.76 ; J4.1 32.01,11.26 ; J4.1 33.67,9.6 ; J4.1 30.35,9.6 ; J4.1 32.01,7.94 ; 21.92,92.33 USB1.13 ; USB1.13 21.92,95.55 ; USB1.13 22.98,93.94 ; C35.2 58.36,4.6 ; C35.2 56.9,3.14 ; C35.2 55.44,4.6 ; 2.58,83.75 SW1.1 1.2,85.13 ; 33.24,56.7 J5.1 ; J5.1 36.16,56.7 ; J5.1 34.7,58.16 ; SW2.1 2.58,74.05 ; SW2.1 1.2,75.43 ; SW2.1 1.2,72.67 ; SW1.4 1.2,92.63 ; SW1.4 1.2,89.87 ; SW1.4 2.58,91.25 ; 3.6,92.39 MH1.1 7.61,96.4 ; 84.42,56.24 J6.4 ; J6.4 84.42,59.16 ; J6.4 85.88,57.7 ; 40.74,91.41 J1.9
  vias: v1(2.32,37.52) v1(2.32,32.52) v1(2.32,27.52) v1(2.32,22.52) v1(2.32,17.52) v1(2.32,12.52) v1(4.49,65.78) v1(4.49,60.78) v1(4.49,55.78) v1(4.49,50.78) v1(7.99,91.42) v1(7.99,86.42) v1(9.6,32.8) v1(9.6,30.8) v1(9.6,28.8) v1(9.6,26.8) v1(9.6,24.8) v1(9.6,22.8) v1(9.6,20.8) v1(9.6,18.8) v1(9.6,16.8) v1(10.45,80.98) v1(10.45,76.88) v1(11.6,24.8) v1(11.6,22.8) v1(11.6,20.8) v1(11.6,18.8) v1(11.6,16.8) v1(13.2,85.7) v1(13.93,3.81) v1(14,29.3) v1(14,28.1) v1(15,29.3) v1(15,28.1) v1(15.1,33) v1(15.18,98.09) v1(15.2,89.5) v1(15.45,80.98) v1(15.45,76.88) v1(15.45,72.68) v1(16,29.3) v1(16,28.1) v1(16.5,65) v1(16.5,63) v1(16.5,61) v1(16.5,59) v1(16.5,33) v1(17.9,55.1) v1(17.9,53.1) v1(17.9,51.1) v1(17.9,49.1) v1(17.9,33) v1(18,37.2) v1(18,35.7) v1(18,34.3) v1(18.93,3.81) v1(19.7,90) v1(20.18,98.09) v1(20.2,29.3) v1(20.2,28.1) v1(20.45,80.98) v1(20.45,76.88) v1(20.45,72.68) v1(20.7,33.7) v1(21.2,29.3) v1(21.2,28.1) v1(21.6,64.9) v1(21.6,62.9) v1(21.6,60.9) v1(21.6,58.9) v1(21.9,33.7) v1(21.9,32.5) v1(22.2,29.3) v1(22.2,28.1) v1(22.8,55.2) v1(22.8,53.2) v1(22.8,51.2) v1(22.8,49.2) v1(23.08,91.09) v1(23.4,45.2) v1(23.4,43.2) v1(23.4,41.2) v1(23.4,39.2) v1(23.4,37.2) v1(23.93,3.81) v1(25.45,72.68) v1(26.2,58.6) v1(26.32,52.02) v1(26.32,47.02) v1(26.3,41.9) v1(26.3,38) v1(26.3,34) v1(27.58,96.89) v1(28.08,91.09) v1(28.42,82.72) v1(28.4,80.4) v1(28.42,77.72) v1(28.42,72.72) v1(28.92,56.92) v1(28.92,51.92) v1(28.9,49.5) v1(28.92,41.92) v1(28.92,38.02) v1(28.92,34.02) v1(28.93,3.81) v1(30.3,87.6) v1(30.3,83.9) v1(31.22,72.72) v1(31.22,67.72) v1(31.63,21.71) v1(31.73,27.91) v1(31.9,76.2) v1(32.5,83.9) v1(32.5,81.7) v1(32.58,96.89) v1(32.62,56.92) v1(32.62,51.92) v1(32.6,49.5) v1(32.62,41.92) v1(32.62,38.02) v1(32.6,34.1) v1(33.93,3.81) v1(34.7,91.1) v1(34.7,87.6) v1(36.63,21.71) v1(36.73,27.91) v1(37.58,96.89) v1(38.93,3.81) v1(39.2,72.1) v1(40.1,89.4) v1(40.73,21.71) v1(40.83,27.91) v1(42.32,56.92) v1(42.32,51.92) v1(42.32,46.92) v1(42.32,41.92) v1(42.58,96.89) v1(42.7,31.9) v1(42.8,93.5) v1(42.8,90.7) v1(42.8,83.7) v1(43.62,38.12) v1(43.62,34.22) v1(43.93,3.81) v1(44.4,73.7) v1(44.4,72.1) v1(45.73,21.71) v1(45.83,27.91) v1(46.23,18.61) v1(46.23,15.21) v1(47.3,82.8) v1(47.32,56.92) v1(47.58,96.89) v1(47.6,85.4) v1(48.3,22.3) v1(48.3,21.1) v1(48.93,3.81) v1(49,45.6) v1(49.3,39.7) v1(49.3,38.5) v1(49.5,33.8) v1(49.94,92.6) v1(50.4,46.3) v1(50.7,56.9) v1(51.13,80.92) v1(51.13,75.92) v1(51.13,70.92) v1(51.23,18.61) v1(51.23,15.21) v1(52.5,28.3) v1(52.5,27.1) v1(52.7,31) v1(53.93,3.81) v1(54.94,92.6) v1(56.2,43.1) v1(56.2,41.9) v1(56.2,40.7) v1(56.2,39.5) v1(56.2,30.9) v1(56.2,29.7) v1(56.2,28.5) v1(56.2,27.3) v1(56.2,18.8) v1(56.2,17.6) v1(56.2,16.4) v1(56.2,15.2) v1(56.63,66.62) v1(56.63,63.82) v1(56.56,57.59) v1(57.2,43.1) v1(57.2,41.9) v1(57.2,40.7) v1(57.2,39.5) v1(57.2,30.9) v1(57.2,29.7) v1(57.2,28.5) v1(57.2,27.3) v1(57.2,18.8) v1(57.2,17.6) v1(57.2,16.4) v1(57.2,15.2) v1(58.2,43.1) v1(58.2,41.9) v1(58.2,40.7) v1(58.2,39.5) v1(58.2,30.9) v1(58.2,29.7) v1(58.2,28.5) v1(58.2,27.3) v1(58.2,18.8) v1(58.2,17.6) v1(58.2,16.4) v1(58.2,15.2) v1(59.94,92.6) v1(60.23,80.92) v1(60.23,75.92) v1(60.23,70.92) v1(60.23,66.62) v1(60.23,63.82) v1(60.16,57.59) v1(62.36,3.95) v1(63,42.2) v1(63,41) v1(63,29.9) v1(63,28.7) v1(63.15,18.54) v1(63.15,13.54) v1(64.94,92.6) v1(65.63,80.82) v1(65.63,75.82) v1(65.63,70.82) v1(65.63,66.62) v1(65.63,63.82) v1(65.56,57.59) v1(67.36,3.95) v1(68.5,27.8) v1(68.6,40) v1(69.7,27.8) v1(69.8,40) v1(69.76,14.05) v1(69.76,8.95) v1(69.94,92.6) v1(70.63,80.82) v1(70.63,75.82) v1(70.63,70.82) v1(70.63,66.62) v1(70.63,63.82) v1(70.56,57.59) v1(72.36,3.95) v1(74.76,14.05) v1(74.76,8.95) v1(74.94,92.6) v1(75.37,33.89) v1(75.37,28.89) v1(75.37,23.89) v1(75.63,80.82) v1(75.63,75.82) v1(75.63,70.82) v1(75.63,66.62) v1(75.63,63.82) v1(77.36,3.95) v1(78.7,59.7) v1(78.7,55.5) v1(78.7,52.4) v1(79.94,92.6) v1(80.63,80.82) v1(80.63,75.82) v1(80.63,70.82) v1(80.63,66.62) v1(82.4,55.5) v1(82.4,52.4) v1(82.36,3.95) v1(83.1,63.8) v1(83.1,59.7) v1(84.43,11.87) v1(84.94,92.6) v1(88,49.3) v1(88,46.7) v1(88,44) v1(89.43,11.87) v1(92.2,90.86) v1(92.2,85.86) v1(92.2,80.86) v1(92.2,75.86) v1(92.2,70.86) v1(92.2,65.86) v1(92.2,60.86) v1(92.2,55.86) v1(94.43,11.87) v1(96.27,30.79) v1(96.27,25.79) v1(96.27,20.79) v1(96.27,15.79) v1(97.2,90.86) v1(97.2,85.86) v1(97.2,80.86) v1(97.2,75.86) v1(97.2,70.86) v1(97.2,65.86) v1(97.2,60.86) v1(97.2,55.86) v2(17,29.5) v2(17,27.9) v2(18.1,28.7) v2(19.2,29.5) v2(19.2,27.9) v2(35.8,82.4) v2(35.8,80.1) v2(35.8,77.8) v2(38.1,82.4) v2(38.1,80.1) v2(38.1,77.8) v2(40.4,82.4) v2(40.4,80.1) v2(40.4,77.8)
VBUS: length 7
  TOP w0.203: U3.8 34.05,79.35 32.2,77.5 C8.1 R11.2 R12.1
VCC_3.3V: length 351.5
  TOP w0.254: U3.35 44.1,82.35 C5.1 ; U3.1 34.35,82.85 34.1,83.1 C2.1 C3.1 35.35,85.8 U3.48 ; U3.23 40.35,75.35 40.8,74.9 41.35,74.9 C11.1 42.25,74.15 42.9,73.5 42.9,72.2 42.5,71.8 40.68,71.8 L1.1 ; U2.7 19.35,85.5 19,85.85 19,86.65 19.35,87 U2.10 20.5,87 20.7,87.2 C1.2
  TOP w0.508: D6.2 v1(87.2,50.4) ; R18.2 v1(92.8,50.4) ; v1(87.2,47.8) D11.2 ; D10.2 v1(85.5,49.2) ; D8.2 v1(78.3,49.2) ; L1.1 v1(40.6,70.9) ; C5.1 v1(44.25,83.35) ; R33.2 v1(92.8,45.2) ; U5.5 19.05,54.6 R15.1 19.05,56.87 C13.1 19.48,58.98 TP2.1 ; R1.2 R2.2 v1(11.55,93.35) ; R3.1 v1(24.5,92.5) ; R7.1 v1(41.1,88.9) ; D12.2 v1(87.2,45.2) ; C1.2 v1(22.15,88.15) ; C2.1 33.55,85.85 v1(33.2,86.2) ; R47.2 51.24,32.91 v1(50.4,32.91) ; R32.2 v1(50.4,45.2) ; D9.2 v1(81.9,49.2) ; R23.2 v1(92.8,47.8) ; R60.2 v1(50.4,20.8)
  BOTTOM w0.508: 46.5,84.3 60.7,84.3 61.74,83.26 R17.2 74.4,53.1 v1(78.3,49.2) v1(81.9,49.2) v1(85.5,49.2) 86.7,50.4 v1(87.2,50.4) v1(92.8,50.4) v1(92.8,47.8) ; 46.5,84.3 46.5,88.9 45.8,89.6 41.8,89.6 ; 46.5,84.3 45.55,83.35 45.45,83.35 ; v1(50.4,20.8) 50.41,20.81 50.41,32.49 50.4,32.51 v1(50.4,32.91) ; 19.1,68.6 19.1,60.1 ; 19.1,68.6 18.2,69.5 RP1.3 ; 19.1,68.6 21.4,70.9 v1(40.6,70.9) 44.7,70.9 45.45,71.65 45.45,83.35 ; v1(92.8,47.8) v1(92.8,45.2) v1(87.2,45.2) ; v1(92.8,47.8) v1(87.2,47.8) ; 41.8,89.6 v1(41.1,88.9) ; 41.8,89.6 41.8,93 41.06,93.73 J1.10 40.74,94.49 40.23,95 34,95 33.2,94.2 v1(33.2,86.2) 27.3,86.2 26.8,86.7 26.8,92.89 26.29,93.4 25.01,93.4 24.5,92.89 v1(24.5,92.5) 24.5,88.6 24.05,88.15 v1(22.15,88.15) 12.06,88.15 11.55,88.66 v1(11.55,93.35) ; 45.45,83.35 v1(44.25,83.35) ; 20.4,59.9 30.4,59.9 31.5,58.8 31.5,33.5 32.09,32.91 v1(50.4,32.91) ; v1(50.4,32.91) 50.41,32.92 50.41,45.19 v1(50.4,45.2)
  vias: v1(18.6,60.6) v1(18.6,59.9) v1(19.5,60.6) v1(19.5,59.9) v1(20.3,60.6) v1(20.3,59.9)
VCC_5V: length 181.7
  TOP w0.508: C12.1 14.15,56.87 R13.1 14.15,54.6 U4.5 ; C12.1 14.58,58.98 TP1.1 ; C12.1 v1(13.3,57.3)
  BOTTOM w0.508: v1(13.3,57.3) 27.1,57.3 27.9,56.5 27.9,8.2 29.3,6.8 76.4,6.8 77.9,8.3 77.9,23.21 J3.7 77.9,28.61 77.9,37.7 79.5,39.3 94,39.3 94.9,40.2 94.9,48.56 J2.5
VCC_5V_USB: length 16.6
  TOP w0.508: USB1.2 20,93.9 19.29,94.61 16.01,94.61 15.2,93.8 USB1.11 15.2,91.96 14.84,91.6 13.7,91.6 13.2,91.1 13.2,88.9 13.7,88.4 15.9,88.4 U1.4
VCC_12V: length 106.3
  TOP w0.203: U5.1 19.5,51.55 19.5,52.5 19.8,52.8 21.1,52.8 21.45,52.45 U5.3 ; U4.1 14.5,51.65 14.6,51.75 14.6,52.6 14.8,52.8 16.3,52.8 16.55,52.55 U4.3 ; R40.1 18.85,37.97 C24.1
  TOP w0.4: U6.7 39.84,33.02 C28.1
  TOP w0.508: v1(51.2,25.7) D15.1 ; v1(51.2,37.8) D13.1 ; D7.1 v1(51.2,50.1) ; C28.1 v1(39.02,31) 25.9,31 25.2,31.7 25.2,45.7 24.3,46.6 TP3.1
  BOTTOM w0.508: v1(39.02,31) 39.02,20.48 39.56,19.94 50.84,19.94 51.2,20.3 v1(51.2,25.7) v1(51.2,37.8) v1(51.2,50.1)
VCC_24V: length 69.7
  TOP w0.203: R56.2 18.3,22.4
  TOP w0.254: R12.2 v1(29.85,57.8)
  TOP w0.711: C35.1 58.36,9.6 ; C35.1 56.9,8.14 ; C35.1 55.44,9.6 ; C35.1 56.9,11.06
  BOTTOM w0.254: v1(29.85,57.8) v1(29.85,17.85)
  BOTTOM w0.711: C35.1 56.9,11.06 ; C35.1 58.36,9.6 ; C35.1 55.44,9.6 ; C35.1 56.9,8.14
  vias: v1(54.9,12) v1(54.9,11) v1(54.9,10) v1(54.9,9) v1(54.9,8) v1(55.9,12) v1(55.9,11) v1(55.9,8) v1(56.9,12) v1(57.9,12) v1(57.9,11) v1(57.9,8) v1(58.9,12) v1(58.9,11) v1(58.9,10) v1(58.9,9) v1(58.9,8) v1(59.9,12) v1(59.9,11) v1(59.9,10) v1(59.9,9) v1(59.9,8) v1(64.7,48.2) v1(64.7,47.6) v1(64.7,47) v1(64.7,35.9) v1(64.7,35.3) v1(64.7,34.7) v1(64.7,23.8) v1(64.7,23.2) v1(64.7,22.6) v1(65.4,48.2) v1(65.4,47.6) v1(65.4,47) v1(65.4,35.9) v1(65.4,35.3) v1(65.4,34.7) v1(65.4,23.8) v1(65.4,23.2) v1(65.4,22.6) v1(66.1,48.2) v1(66.1,47.6) v1(66.1,47) v1(66.1,35.9) v1(66.1,35.3) v1(66.1,34.7) v1(66.1,23.8) v1(66.1,23.2) v1(66.1,22.6)
VCC_24V_IN: length 8.9
  TOP w2: F1.1 14.3,14.24 DC1.1 17.08,14.12 17.1,14.1 ; J4.2 24.39,11.89 24.4,11.9
VDDA: length 6.7
  TOP w0.203: U3.21 39.35,74.4 C10.1 38.85,74.4 U3.20
  TOP w0.508: L1.2 40.37,74.15 C10.1
A+/H1: length 95.8
  TOP w0.203: R18.1 R19.2 C15.1 89.85,50.05 D6.1 88.8,51.1 87.2,51.1 87,51.3 87,84.6 85.1,86.5 54.9,86.5 53.1,88.3 v1(45.7,88.3) ; U3.44 37.35,84.55 37.1,84.8 37.1,86.6 37.7,87.2 v1(37.7,88.3)
  BOTTOM w0.203: v1(45.7,88.3) v1(37.7,88.3)
B+/H2: length 98
  TOP w0.203: U3.45 36.85,84.55 36.71,84.69 v1(36.71,87.59) ; R23.1 R29.2 C18.1 89.85,47.45 D11.1 88.8,48.5 86.8,48.5 86.6,48.7 86.6,84.43 84.93,86.1 54.73,86.1 53.24,87.59 v1(45.19,87.59)
  BOTTOM w0.203: v1(45.19,87.59) v1(36.71,87.59)
BEMF1: length 72.3
  TOP w0.203: U3.12 34.6,63.5 36,62.1 76.1,62.1 76.8,61.4 J6.1 76.8,49.9 D8.1
  TOP w0.254: D8.1 76.35,48.95 R20.2 76.35,47.95 77.25,47.05 R26.1
BEMF2: length 72.4
  TOP w0.203: R27.1 80.85,46.95 79.95,47.85 R21.2 79.95,48.05 79.7,48.3 D9.1 80.4,49.9 80.4,56.64 J6.2 79.34,64.36 78.4,65.3 37.8,65.3 36.85,66.25 U3.16
BEMF3: length 70.6
  TOP w0.203: R28.1 84.45,46.95 83.55,47.85 R22.2 83.3,48.25 D10.1 84,49.9 84,55.58 J6.3 81.88,66.72 80.7,67.9 44.4,67.9 43.6,68.7 43.6,74.9 42.9,75.6 41.4,75.6 40.85,76.15 U3.24
BUTTON: length 44.9
  TOP w0.203: SW2.3 v1(5.7,80) ; U3.39 v1(39.85,85) 39.85,85.8 C4.1 R7.2
  BOTTOM w0.203: v1(5.7,80) 5.7,84.6 6.1,85 v1(39.85,85)
CH340E_RXD: length 26.7
  TOP w0.203: D1.3 v1(9.5,98.6) ; U2.9 v1(21.3,86.5) 21.65,86.5 R8.2
  BOTTOM w0.203: v1(21.3,86.5) 10.4,86.5 9.5,87.4 v1(9.5,98.6)
CH340E_TXD: length 27.6
  TOP w0.203: R9.2 v1(21.32,85.62) 20.95,86 U2.8 ; D1.1 v1(10.5,98.6)
  BOTTOM w0.203: v1(21.32,85.62) 21.86,86.16 21.86,86.94 21.6,87.2 11.2,87.2 10.5,87.9 v1(10.5,98.6)
CURR_FDBK1_OPAMP+: length 55.6
  TOP w0.203: v1(52.9,60.5) 34.9,60.5 33,62.4 33,77.7 34.15,78.85 U3.9
  TOP w0.254: v1(52.9,45.8) 52.3,46.4 R30.2 ; v1(52.9,45.8) R31.1 ; v1(52.9,45.8) 52.3,45.2 R32.1
  BOTTOM w0.203: v1(52.9,60.5) v1(52.9,45.8)
CURR_FDBK1_OPAMP-: length 53.6
  TOP w0.203: v1(49.7,61.3) 35.41,61.3 33.8,62.91 33.8,77.6 34.05,77.85 U3.11 ; R37.1 v1(49.7,41.4)
  BOTTOM w0.203: v1(49.7,61.3) v1(49.7,41.4)
CURR_FDBK2_OPAMP+: length 61.7
  TOP w0.203: v1(52.3,64.2) 37.1,64.2 36.35,64.95 U3.15
  TOP w0.254: R46.1 v1(52.9,33.5) ; v1(52.9,33.5) 52.3,34.1 R45.2 ; v1(52.9,33.5) 52.3,32.9 R47.1
  BOTTOM w0.203: v1(52.3,64.2) 52.3,34.1 v1(52.9,33.5)
CURR_FDBK2_OPAMP-: length 64
  TOP w0.203: R50.1 51.25,29.7 51.55,30 52.09,30 v1(52.1,30.01) ; v1(51.6,63.2) 36.4,63.2 35.35,64.25 U3.13
  BOTTOM w0.203: v1(52.1,30.01) 51.8,30.31 51.8,63 v1(51.6,63.2)
CURR_FDBK3_OPAMP+: length 74
  TOP w0.203: v1(53.6,66.1) 38.4,66.1 37.35,67.15 U3.17
  TOP w0.254: R58.2 52.3,22 v1(52.9,21.4) ; R60.1 52.3,20.8 v1(52.9,21.4) ; R59.1 v1(52.9,21.4)
  BOTTOM w0.203: v1(53.6,66.1) 53.6,22.1 v1(52.9,21.4)
CURR_FDBK3_OPAMP-: length 79.2
  TOP w0.203: U3.19 38.35,67.56 38.81,67.1 v1(54.3,67.1) ; R63.1 v1(50.5,17)
  BOTTOM w0.203: v1(54.3,67.1) 54.3,18 53.3,17 v1(50.5,17)
GPIO_BEMF: length 94.9
  TOP w0.203: U3.43 37.85,86.15 v1(37.7,86.3) ; v1(45.09,86.28) 53.43,86.28 54.4,85.3 84.5,85.3 85.8,84 85.8,52.4 v1(84.7,51.3) D5.2 ; D3.2 v1(77.5,51.3) ; v1(81.1,51.3) D4.2
  BOTTOM w0.203: v1(77.5,51.3) v1(81.1,51.3) v1(84.7,51.3) ; v1(45.09,86.28) 37.72,86.28 v1(37.7,86.3)
H1: length 51.6
  TOP w0.203: J2.3 94.72,45.38 94.2,45.9 94.2,48.8 93.8,49.2 R19.1
  BOTTOM w0.203: J2.3 99.02,45.38 99.4,45 99.4,37.2 98.9,36.7 84.9,36.7 84.1,35.9 84.1,22.7 83.11,21.71 J3.8
H2: length 39
  TOP w0.203: J2.2 94.06,42.84 93.6,43.3 93.6,46.2 93.2,46.6 R29.1
  BOTTOM w0.203: J3.6 82.61,30.11 83.2,30.7 83.2,36.4 84.4,37.6 98.2,37.6 98.6,38 98.6,42.3 98.06,42.84 J2.2
H3: length 29.3
  TOP w0.203: R36.1 92,43.95 92,41 92.7,40.3 J2.1
  BOTTOM w0.203: J2.1 96.8,38.9 96.4,38.5 81.9,38.5 80.6,37.2 J3.5
HO1: length 16.7
  TOP w0.254: U6.19 47.95,36.27 48.2,36.53 48.2,46.1 49.2,47.1 R25.1
HO2: length 6.9
  TOP w0.254: R44.1 49.33,34.8 48.84,34.32 47.11,34.32 U6.16
HO3: length 15.6
  TOP w0.254: R55.1 49.2,22.7 48.83,23.07 48.83,31.57 48.02,32.38 U6.13
LO1: length 24
  TOP w0.254: R35.1 v1(49,44.5) ; v1(45,44.5) 45,31.6 45.52,31.07 U6.11
  BOTTOM w0.254: v1(49,44.5) v1(45,44.5)
LO2: length 13.3
  TOP w0.254: R49.1 v1(49.7,32.2) ; U6.10 43.27,31.07 43.7,31.5 v1(43.7,32.2)
  BOTTOM w0.254: v1(49.7,32.2) v1(43.7,32.2)
LO3: length 25.6
  TOP w0.254: R62.1 47.6,20.1 47.2,20.5 47.2,29.6 46.6,30.2 40.35,30.2 40.1,30.45 40.1,31.47 40.35,31.73 U6.9
MOTOR_U: length 93.2
  TOP w0.203: 77.9,41.3 77.9,47.35 R20.1
  TOP w0.254: U6.18 46.1,35.62 45.8,35.92 45.8,50.2 46.9,51.3 59.02,51.3 C14.2 ; Q1.1 56.05,48.2 R24.2
  TOP w0.762: 70.02,46.18 R39.2
  TOP w2: MH3.1 69.9,47.4 ; MH3.1 71.8,48.2 71.8,50.2 ; MH3.1 68.7,45.1 65.8,45.1 ; MH3.1 74.9,41.3 84.8,41.3 89,37.1 89,33.01 J3.2 ; 69.9,47.4 69.9,50.1 69.7,50.3 ; 69.9,47.4 67.3,50
MOTOR_V: length 88.2
  TOP w0.203: R21.1 81.5,47.35 81.5,44.4 82.35,43.55 85.45,43.55 90.7,38.3 90.7,30.2 88.6,28.1 84.9,28.1 84.1,28.9 84.1,32.31 J3.1
  TOP w0.254: Q2.1 56.15,35.9 R42.2 49.35,35.65 v1(48.6,34.9) ; v1(48.6,33.67) U6.15
  TOP w0.762: MH4.1 70.02,33.88 R52.2
  TOP w2: J3.1 82.41,38 71.9,38 71.8,37.9 71.8,35.9 MH4.1 ; 69.9,35.1 MH4.1 ; 69.9,35.1 67.3,37.7 ; 69.9,35.1 69.9,37.8 69.7,38 ; MH4.1 68.7,32.8 65.8,32.8
  BOTTOM w0.254: v1(48.6,34.9) v1(48.6,33.67)
MOTOR_W: length 99.7
  TOP w0.203: J3.4 86.19,21.8 89.5,21.8 91.5,23.8 91.5,38.9 85.1,45.3 85.1,47.35 R22.1 ; 68.6,20.7 68.7,20.7 MH5.1
  TOP w0.254: v1(49.42,23.65) R54.2 56.05,23.8 Q3.1 ; U6.12 48,31.73 48.25,31.47 v1(48.25,23.65)
  TOP w0.762: 69.8,21.9 69.92,21.78 69.92,17 ; 70.02,21.78 R65.2
  TOP w2: 67.2,25.6 69.8,23 ; 69.8,23 69.8,21.9 ; 69.8,23 69.8,25.7 69.6,25.9 ; 71.7,25.8 71.7,23.8 69.8,21.9 ; 69.8,21.9 68.6,20.7 65.7,20.7 ; J3.4 83.09,18.7 73.1,18.7 MH5.1
  BOTTOM w0.254: v1(49.42,23.65) v1(48.25,23.65)
NRST: length 43.2
  TOP w0.203: U3.7 33.95,79.85 33,78.9 v1(31.7,78.9) C6.1 ; v1(4.5,89.7) 3.4,89.7 3.3,89.6 SW1.3
  BOTTOM w0.203: v1(31.7,78.9) 5.3,78.9 4.5,79.7 v1(4.5,89.7)
OSC_IN: length 5.8
  TOP w0.203: X1.1 31.2,82.8 31.7,82.3 31.7,81.2 32.05,80.85 U3.5
OSC_OUT: length 4.3
  TOP w0.203: X1.3 30.35,80.35 U3.6
POTENTIOMETER: length 45.5
  TOP w0.203: v1(44.25,74.75) C9.1 42.5,77.35 U3.25
  BOTTOM w0.203: v1(44.25,74.75) 11.45,74.75 10.8,74.1 10.8,68.2 RP1.2
STATUS: length 33.1
  TOP w0.203: U3.29 43.45,79.35 v1(43.6,79.5) ; R4.1 v1(25.7,92.5)
  BOTTOM w0.203: v1(43.6,79.5) 43.6,85 43,85.6 26.4,85.6 25.7,86.3 v1(25.7,92.5)
SWCLK: length 14.4
  TOP w0.203: U3.37 41.8,83.6 42.1,83.9 42.1,89.7 41.3,90.5 37.3,90.5 36.9,90.9 36.9,92.44 J1.3
SWDIO: length 25.1
  TOP w0.203: U3.36 43.15,82.85 43.69,83.39 43.69,94.01 43.1,94.6 34.9,94.6 34.6,94.3 34.6,92.8 34.9,92.5 35.62,92.5 J1.1
TEMPERATURE_FEEDBACK: length 45
  TOP w0.203: C7.1 43.9,78.35 U3.27 ; C7.1 R10.2 ; C7.1 44.25,78.15 44.9,78.8 v1(59.1,78.8)
  BOTTOM w0.203: v1(59.1,78.8) 59.1,53.2 R17.1
TIM1_CH1: length 80.4
  TOP w0.203: J5.2 37.74,54.16 38.4,53.5 v1(38.4,36.92) U6.1 ; v1(46.9,80.14) 43.14,80.14 42.85,79.85 U3.30
  BOTTOM w0.203: v1(46.9,80.14) 47,80.14 47.2,79.94 47.2,70.4 46.5,69.7 38.9,69.7 38.4,69.2 v1(38.4,36.92)
TIM1_CH1N: length 71.3
  TOP w0.203: U6.4 37.42,34.98 36.9,35.5 36.9,45.8 36.16,46.54 J5.5 28.16,46.54 27.5,47.2 27.5,84.4 28,84.9 32.9,84.9 33.45,84.35 33.45,82.95 34.05,82.35 U3.2
TIM1_CH2: length 79.6
  TOP w0.203: U6.2 39.02,36.27 v1(39,36.3) 38.1,36.3 37.7,36.7 37.7,50.8 36.88,51.62 J5.3 ; U3.31 42.66,80.35 43.01,80.7 v1(46.4,80.7)
  BOTTOM w0.203: v1(39,36.3) 39,68.7 39.4,69.1 46.9,69.1 47.7,69.9 47.7,80.3 47.3,80.7 v1(46.4,80.7)
TIM1_CH2N: length 78
  TOP w0.203: U3.34 v1(46.4,81.85) ; J5.6 35.9,44 36.4,43.5 36.4,35 37.1,34.3 v1(40.2,34.3) 40.23,34.33 U6.5
  BOTTOM w0.203: v1(40.2,34.3) 40.2,67.6 40.4,67.8 47.7,67.8 48.9,69 48.9,81.2 48.25,81.85 v1(46.4,81.85)
TIM1_CH3: length 79.5
  TOP w0.203: v1(46.9,81.29) 42.89,81.29 42.45,80.85 U3.32 ; U6.3 v1(39.6,35.62) 37.67,35.62 37.26,36.04 37.26,48.34 36.52,49.08 J5.4
  BOTTOM w0.203: v1(46.9,81.29) 46.91,81.3 47.7,81.3 48.3,80.7 48.3,69.5 47.2,68.4 39.8,68.4 39.6,68.2 v1(39.6,35.62)
TIM1_CH3N: length 66.9
  TOP w0.203: U3.28 43.75,78.85 44.4,79.5 v1(46.4,79.5) ; J5.7 34.7,41.4 36,40.1 36,34.3 36.62,33.67 U6.6
  BOTTOM w0.203: v1(46.4,79.5) 46.4,71 45.7,70.3 38.5,70.3 37.7,69.5 37.7,42 37.1,41.4 34.76,41.4 J5.7
USART2_RX: length 28.7
  TOP w0.203: U3.42 38.45,83.7 v1(38.45,89.4) 26.2,89.4 25.7,88.9 25.7,85.4 25.1,84.8 R9.1
  BOTTOM w0.203: v1(38.45,89.4) 38.45,91.44 J1.7
USART2_TX: length 30.5
  TOP w0.203: R8.1 24.7,86 25.1,86.4 25.1,89.2 25.9,90 38.7,90 39.09,89.61 v1(39.09,88.9) 38.85,88.67 U3.41
  BOTTOM w0.203: J1.5 37.8,92.06 37.8,89.2 38.16,88.84 39.03,88.84 v1(39.09,88.9)
USB_DM: length 11.7
  TOP w0.203: USB1.5 18.35,91.35 U1.2 18.01,91 ; USB1.7 17.35,91.66 18.01,91 ; 18.01,91 17.8,90.8 17.8,87.3 17.05,86.55 16.18,86.55 16.14,86.5 U2.2
USB_DP: length 11.7
  TOP w0.203: USB1.6 17.85,93.76 17.71,93.9 17,93.9 16.85,93.75 USB1.8 16.85,91.35 U1.3 17.19,91 17.4,90.8 17.4,87.47 16.88,86.95 16.18,86.95 16.14,87 U2.1
VB1: length 23.2
  TOP w0.254: U6.20 47.1,48.1 48,49 55.3,49 56.15,49.85 D7.2
  TOP w0.508: D7.2 C14.1
VB2: length 12.4
  TOP w0.254: D13.2 56.15,37.55 55.2,36.6 49.4,36.6 47.77,34.98 U6.17
  TOP w0.508: D13.2 C25.1
VB3: length 19
  TOP w0.254: U6.14 48.05,33.02 49.4,31.67 49.4,25.2 50,24.6 55.3,24.6 56.15,25.45 D15.2
  TOP w0.508: D15.2 C30.1
VSHUNT1+: length 3.6
  TOP w0.254: Q1.3 56.11,45.66 R34.1 55.55,45.8 R31.2
VSHUNT2+: length 3.6
  TOP w0.254: R46.2 55,33.15 R48.1 56.11,33.36 Q2.3
VSHUNT3+: length 3.6
  TOP w0.254: R59.2 55.55,21.4 R61.1 56.11,21.26 Q3.3
Z+/H3: length 101.5
  TOP w0.203: v1(45.7,86.9) 53.37,86.9 54.57,85.7 84.77,85.7 86.2,84.27 86.2,46.1 86.4,45.9 88.8,45.9 D12.1 89.85,44.85 C20.1 R36.2 R33.1 ; U3.46 36.35,84.45 36,84.8 v1(36,87.6)
  BOTTOM w0.203: v1(45.7,86.9) 36.3,86.9 36,87.2 v1(36,87.6)
N17247390: length 1.6
  TOP w0.203: D2.4 24.6,94.35 R3.2
N17247402: length 1.6
  TOP w0.203: R4.2 25.6,94.35 D2.2
N17273688: length 3.5
  TOP w0.203: Q1.2 56.12,46.93 R24.1 55.85,47.1 R25.2
N17273734: length 3.5
  TOP w0.254: R35.2 55.85,44.5 R34.2 56.06,44.39 Q1.4
N17273904: length 3.5
  TOP w0.254: Q2.2 56.02,34.63 R42.1 54.7,34.75 R44.2
N17273950: length 3.5
  TOP w0.254: Q2.4 56.06,32.09 R48.2 54.7,32.25 R49.2
N17274120: length 3.5
  TOP w0.254: R55.2 55.85,22.7 R54.1 56.12,22.53 Q3.2
N17274166: length 3.5
  TOP w0.254: R62.2 55.85,20.1 R61.2 56.06,19.99 Q3.4
N17276179: length 1.4
  TOP w0.762: R39.1 C22.1
N17276228: length 1.4
  TOP w0.762: C29.1 R52.1
N17276293: length 1.4
  TOP w0.762: C34.1 R65.1
N17277391: length 2.4
  TOP w0.203: C31.1 15.6,24.8 16.2,25.4 U7.1
N17277395: length 8.5
  TOP w0.203: C31.2 v1(12.7,24.8)
  BOTTOM w0.203: v1(12.7,24.8) v1(12.7,32.3)
N17277528: length 10.1
  TOP w0.203: U7.5 22.4,31.4 22.9,31.9 22.9,35.3 22.5,35.7 21.64,35.7 20.95,36.39 R41.1 R40.2
N17277556: length 5.2
  TOP w0.203: U7.3 18.74,24.86 19.9,23.7 19.9,22.45 R56.1 R57.2
N17277560: length 3.5
  TOP w0.203: U7.6 18.74,33.59 C27.1 R43.2
N17277584: length 2.7
  TOP w0.203: R53.2 20.01,24.74 U7.4
N17277642: length 1.2
  TOP w0.203: R43.1 C26.1
N17277768: length 2.9
  TOP w0.203: R15.2 R16.1 21.45,55.3 U5.4
N17277886: length 2.9
  TOP w0.203: R13.2 R14.1 16.55,55.3 U4.4
N17278520: length 5.1
  TOP w0.203: D3.1 75.5,50.4 75.3,50.2 75.3,47.2 75.7,46.8 R26.2
N17278525: length 5.2
  TOP w0.203: D4.1 79.1,50.4 78.9,50.2 78.9,47.1 79.2,46.8 R27.2
N17278530: length 5
  TOP w0.203: R28.2 82.8,46.8 82.6,47 82.6,50.2 82.8,50.4 D5.1
N17295441: length 1.6
  TOP w0.203: R2.1 10.5,94.35 D1.2
N17295448: length 4
  TOP w0.203: R6.2 20.8,91.3 20.4,91.7 19.2,91.7 18.85,92.05 USB1.4
N17295460: length 1.6
  TOP w0.203: D1.4 9.5,94.35 R1.1
N17295531: length 3.6
  TOP w0.203: USB1.10 15.85,91.05 15.25,90.45 R5.1

## Copper pours and planes (outline as drawn; the poured copper is in the pictures)
GND on TOP: 99.7,3.6 98.73,1.27 96.4,0.3 3.6,0.3 1.27,1.27 0.3,3.6 0.3,96.4 1.27,98.73 3.6,99.7 96.4,99.7 98.73,98.73 99.7,96.4 ; 24 cut-outs
GND on BOTTOM: 99.7,3.6 98.73,1.27 96.4,0.3 3.6,0.3 1.27,1.27 0.3,3.6 0.3,96.4 1.27,98.73 3.6,99.7 96.4,99.7 98.73,98.73 99.7,96.4 ; 4 cut-outs
VCC_3.3V on TOP: 20,56.6 20,58 20.7,58.7 20.7,60.8 20.4,61.1 18.4,61.1 18.1,60.8 18.1,58.7 18.9,57.9 18.9,56.6
VCC_3.3V on BOTTOM: 18.4,61.1 20.4,61.1 20.7,60.8 20.7,58.7 20.4,58.4 18.4,58.4 18.1,58.7 18.1,60.8
VCC_12V on TOP: 18.8,52.2 20.1,52.2 20.1,38 18.2,38 17.9,38.3 17.9,42.9 17.5,43.3 10.7,43.3 10.7,45.9 18.6,45.9 18.8,46.1 18.8,46.5 18.6,46.7 14.3,46.7 14,47 14,52.2 15.1,52.2 15.1,48.3 15.4,48 18.7,48 18.8,48.1
VCC_24V on TOP: 62.7,34.3 66.2,34.3 66.4,34.5 66.4,36.1 66.2,36.3 62.7,36.3
VCC_24V on TOP: 16.3,16.7 16.3,24.4 17.1,25.2 17.1,26.8 17.9,26.8 17.9,24.3 18.4,23.8 18.4,21.7 18.9,21.2 20.7,21.2 20.7,19.2 21,18.9 43.3,18.9 44.1,18.1 44.1,13 44.5,12.6 60.1,12.6 60.8,11.9 60.8,8.3 60.2,7.7 37.6,7.7 36.9,8.4 36.9,16.1 36.3,16.7
VCC_24V on TOP: 62.7,22.2 66.2,22.2 66.4,22.4 66.4,24 66.2,24.2 62.7,24.2
VCC_24V on TOP: 62.7,46.6 66.2,46.6 66.4,46.8 66.4,48.4 66.2,48.6 62.7,48.6
VCC_24V on BOTTOM: 54.7,7.7 65.8,7.7 66.4,8.3 66.4,48.4 66.2,48.6 64.3,48.6 64.1,48.4 64.1,12.9 63.8,12.6 54.7,12.6 54.3,12.2 54.3,8.1
VCC_24V_IN on TOP: 13.5,15.2 24.5,15.2 25.6,14.1 25.6,9.2 24.9,8.5 23.8,8.5 23.3,9 23.3,12.5 22.7,13.1 12.9,13.1 12.3,13.7 12.3,14.5 12.9,15.1 13.4,15.1
MOTOR_U on TOP: 57.3,47.8 61.8,47.8 62.1,48.1 62.1,49 62.3,49.2 66.6,49.2 67.6,48.2 67.6,47.4 66.9,46.7 66.8,46.7 66.8,46.3 66.5,46 62.7,46 62.7,44.1 71.9,44.1 72.9,45.1 72.9,50.6 72,51.5 60.5,51.5 59.7,50.7 59.7,48.9 59.5,48.7 57.3,48.7
MOTOR_V on TOP: 57.3,35.5 61.8,35.5 62.1,35.8 62.1,36.7 62.3,36.9 66.6,36.9 67.6,35.9 67.6,35.1 66.9,34.4 66.8,34.4 66.8,34 66.5,33.7 62.7,33.7 62.7,31.8 71.9,31.8 72.9,32.8 72.9,38.3 72,39.2 60.5,39.2 59.7,38.4 59.7,36.6 59.5,36.4 57.3,36.4
MOTOR_W on TOP: 57.2,23.4 61.7,23.4 62,23.7 62,24.6 62.2,24.8 66.5,24.8 67.5,23.8 67.5,23 66.8,22.3 66.7,22.3 66.7,21.9 66.4,21.6 62.6,21.6 62.6,19.7 71.8,19.7 72.8,20.7 72.8,26.2 71.9,27.1 60.4,27.1 59.6,26.3 59.6,24.5 59.4,24.3 57.2,24.3
VSHUNT1+ on TOP: 57.3,46 61.6,46 61.9,45.7 61.9,39.7 59.5,39.7 59.3,39.9 59.3,45.1 59.1,45.3 57.3,45.3
VSHUNT2+ on TOP: 57.3,33.7 61.6,33.7 61.9,33.4 61.9,27.4 59.5,27.4 59.3,27.6 59.3,32.8 59.1,33 57.3,33
VSHUNT3+ on TOP: 57.3,21.6 61.6,21.6 61.9,21.3 61.9,15.3 59.5,15.3 59.3,15.5 59.3,20.7 59.1,20.9 57.3,20.9
N17277395 on TOP: 10.7,35.5 10.7,32.4 11.5,31.6 11.5,29.9 13.4,29.9 14.1,30.6 16.5,30.6 16.5,32.2 14.8,32.2 14.3,32.7 14.3,35.5

## Text on the board
Ref Des/Silkscreen Top: NRST | 5V | 3V3 | 12V | 24V | GND | CH1 | CH2 | CH3 | CH1N | CH2N | CH3N | NTC | B-G431-ESC1_V10 | 220728 | XXXLZJXXX | U | V | W | H3 | H2 | H1 | G | TX | RX | STATUS | BEMF1 | BEMF2 | BEMF3
BODY_CENTER: FIGURE | FINISHED_SIZE | 0.254 | 0.4572 | 0.6 | 0.9 | 1.0 | 1.1 | 1.5 | 1.8 | 3.1 | 3.3 | 1.2x0.6 | 1.7x0.6 | 3.0x1.0 | DRILL CHART: TOP to BOTTOM | ALL UNITS ARE IN MILLIMETERS | ROTATION | - | 90.000 | 0.000 | PLATED | QTY | 441 | 14 | 13 | 2 | 4 | 19 | 8 | 3 | 1 | 517 | TOTAL HOLES:
